# EAGLE board PCB_ESP32_v19 (EAGLE 9.7.0)
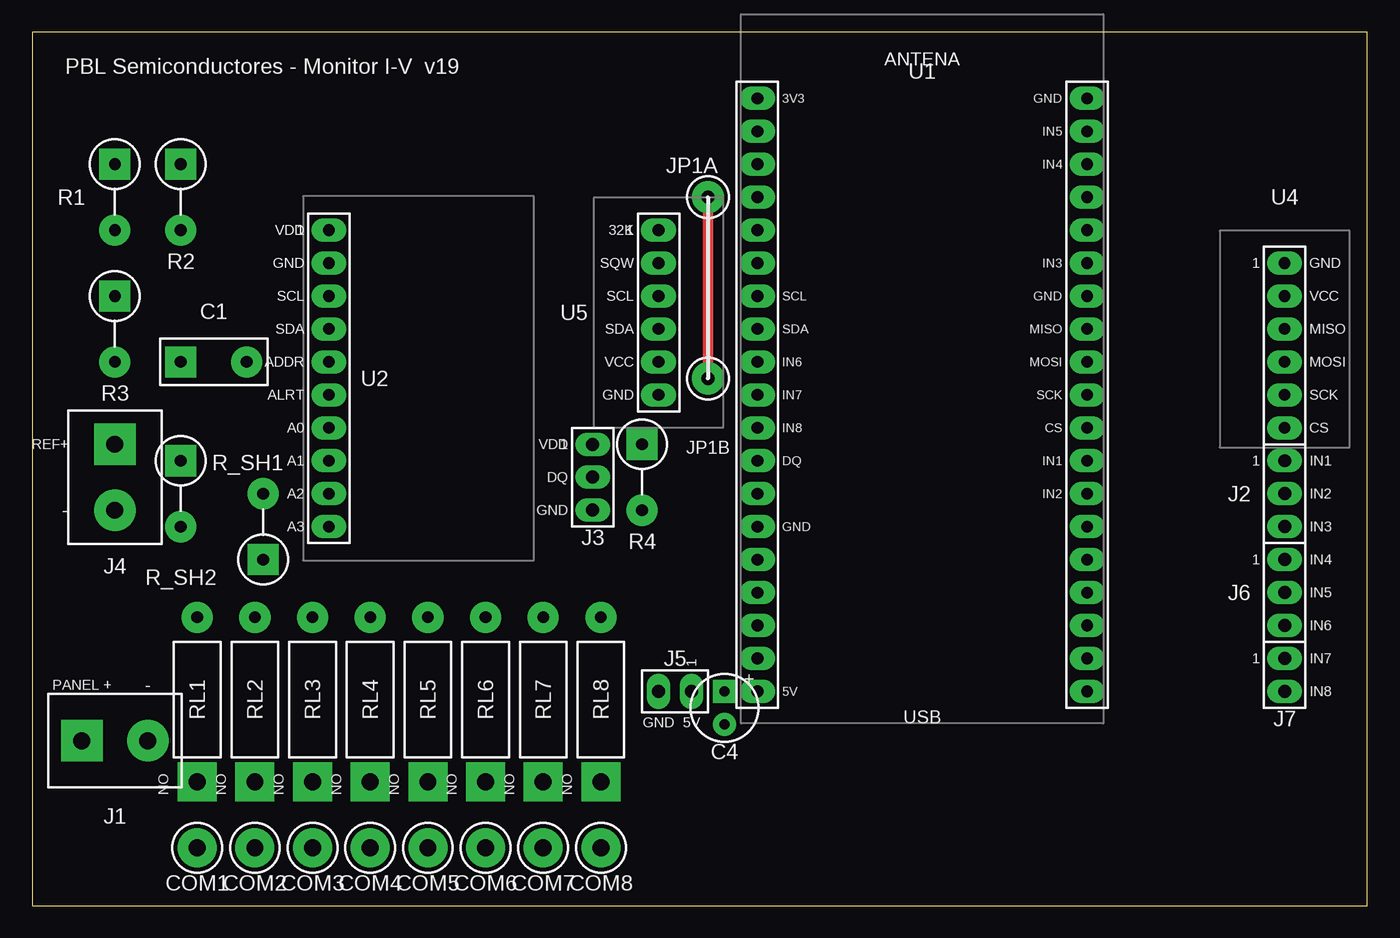
[diagram p0: board, top side]
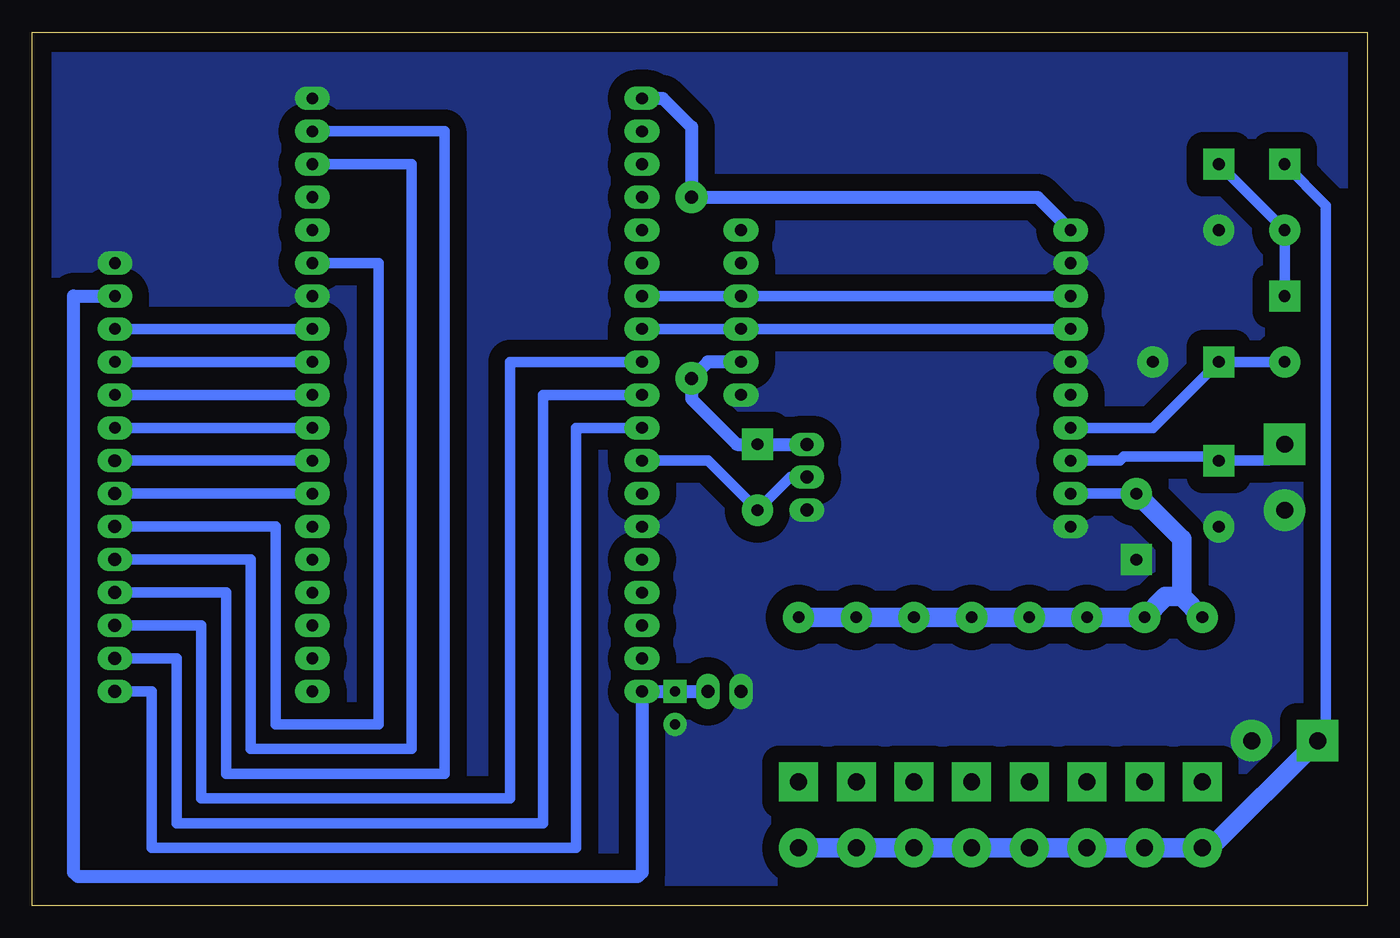
[diagram p1: board, bottom side, seen from below]

Size 102.87 x 67.31 mm. Coordinates in mm from the lower left corner, seen from the top.
Outline: 0,0 102.87,0 102.87,67.31 0,67.31 0,0
Copper layers (1*16): Top 0.035mm / dielectric 1.5mm / Bottom 0.035mm
Design rules "PBL v19 (planchado / percloruro)": minimum track width 0.8mm, minimum drill 0.5mm, track to track 1mm, track to pad 1mm, pad to pad 0.5mm, via to via 0.5mm, smd to smd 6mil, copper to edge 1.5mm, drill to drill 0.3mm, minimum pad ring 0.4mm, minimum via ring 0.4mm, stop-mask expansion 4mil, vias tented up to drill 9999mil, thermal gap 0.6mm
Net classes: 0 senal: width 0.8 mm, drill 0.8 mm; 1 potencia: width 0.8 mm, drill 0.8 mm; 2 alim: width 0.8 mm, drill 0.8 mm

## Footprints (pad centres in the part's own frame; a part is rotated, then mirrored left to right if it is on the bottom)
CAP_5MM = drill 0.9 pad 2.4 square: 1 0,0 | drill 0.9 pad 2.4 round: 2 5.08,0
CAP_E_2_54 = drill 0.8 pad 1.8 square: 1 0,0 | drill 0.8 pad 1.8 round: 2 2.54,0
WIREPAD = drill 1.3 pad 3 round: 1 0,0
TERM2_5MM = drill 1.3 pad 3.2 square: 1 0,0 | drill 1.3 pad 3.2 round: 2 5.08,0
MALE_1X03 = drill 1 pad 1.8 long: 1 0,0; 2 0,-2.54; 3 0,-5.08
MALE_1X02 = drill 1 pad 1.8 long: 1 0,0; 2 0,-2.54
JPAD = drill 1 pad 2.5 round: 1 0,0
RES_V = drill 0.9 pad 2.4 square: 1 0,0 | drill 0.9 pad 2.4 round: 2 5.08,0
RES_H_T = drill 1.3 pad 3 square: 1 0,0 | drill 0.9 pad 2.4 round: 2 12.7,0
ESP32_DEVKIT38 = drill 0.9 pad 1.8 long: 1 0,0; 2 0,-2.54; 3 0,-5.08; 4 0,-7.62; 5 0,-10.16; 6 0,-12.7; 7 0,-15.24; 8 0,-17.78; 9 0,-20.32; 10 0,-22.86; 11 0,-25.4; 12 0,-27.94; 13 0,-30.48; 14 0,-33.02; 15 0,-35.56; 16 0,-38.1; 17 0,-40.64; 18 0,-43.18; 19 0,-45.72; 20 25.4,-45.72; 21 25.4,-43.18; 22 25.4,-40.64; 23 25.4,-38.1; 24 25.4,-35.56; 25 25.4,-33.02; 26 25.4,-30.48; 27 25.4,-27.94; 28 25.4,-25.4; 29 25.4,-22.86; 30 25.4,-20.32; 31 25.4,-17.78; 32 25.4,-15.24; 33 25.4,-12.7; 34 25.4,-10.16; 35 25.4,-7.62; 36 25.4,-5.08; 37 25.4,-2.54; 38 25.4,0
SOCKET_1X10 = drill 0.9 pad 1.8 long: 1 0,0; 2 0,-2.54; 3 0,-5.08; 4 0,-7.62; 5 0,-10.16; 6 0,-12.7; 7 0,-15.24; 8 0,-17.78; 9 0,-20.32; 10 0,-22.86
SOCKET_1X06 = drill 0.9 pad 1.8 long: 1 0,0; 2 0,-2.54; 3 0,-5.08; 4 0,-7.62; 5 0,-10.16; 6 0,-12.7

## Placement (x,y rotation side)
C1  0.1u  [CAP_5MM]  11.43,41.91 0 top
C4  10u 16V  [CAP_E_2_54]  53.34,16.51 270 top
COM1  COM K1  [WIREPAD]  12.7,4.45 0 top
COM2  COM K2  [WIREPAD]  17.14,4.45 0 top
COM3  COM K3  [WIREPAD]  21.59,4.45 0 top
COM4  COM K4  [WIREPAD]  26.04,4.45 0 top
COM5  COM K5  [WIREPAD]  30.48,4.45 0 top
COM6  COM K6  [WIREPAD]  34.92,4.45 0 top
COM7  COM K7  [WIREPAD]  39.37,4.45 0 top
COM8  COM K8  [WIREPAD]  43.81,4.45 0 top
J1  Panel  [TERM2_5MM]  3.81,12.7 0 top
J2  Reles IN1-IN3  [MALE_1X03]  96.52,34.29 0 top
J3  DS18B20  [MALE_1X03]  43.18,35.56 0 top
J4  Celda referencia  [TERM2_5MM]  6.35,35.56 270 top
J5  Rele 5V y GND  [MALE_1X02]  50.8,16.51 270 top
J6  Reles IN4-IN6  [MALE_1X03]  96.52,26.67 0 top
J7  Reles IN7-IN8  [MALE_1X02]  96.52,19.05 0 top
JP1A  Puente 1 (3V3)  [JPAD]  52.07,54.61 0 top
JP1B  Puente 1 (3V3)  [JPAD]  52.07,40.64 0 top
R1  33k 1%  [RES_V]  6.35,57.15 270 top
R2  10k 1%  [RES_V]  11.43,57.15 270 top
R3  1k  [RES_V]  6.35,46.99 270 top
R4  4.7k  [RES_V]  46.99,35.56 270 top
R_SH1  1  [RES_V]  17.78,26.67 90 top
R_SH2  1  [RES_V]  11.43,34.29 270 top
RL1  2.2  [RES_H_T]  12.7,9.53 90 top
RL2  4.7  [RES_H_T]  17.14,9.53 90 top
RL3  10  [RES_H_T]  21.59,9.53 90 top
RL4  22  [RES_H_T]  26.04,9.53 90 top
RL5  47  [RES_H_T]  30.48,9.53 90 top
RL6  100  [RES_H_T]  34.92,9.53 90 top
RL7  220  [RES_H_T]  39.37,9.53 90 top
RL8  470  [RES_H_T]  43.81,9.53 90 top
U1  ESP32 DevKitC 38 pines  [ESP32_DEVKIT38]  55.88,62.23 0 top
U2  ADS1115 (modulo)  [SOCKET_1X10]  22.86,52.07 0 top
U4  Modulo microSD SPI  [SOCKET_1X06]  96.52,49.53 0 top
U5  Modulo RTC DS3231  [SOCKET_1X06]  48.26,52.07 0 top

## Library data of the parts
C1 C4 COM1-COM8 J1-J7 JP1A JP1B R1-R4 R_SH1 R_SH2 RL1-RL8 U1 U2 U4 U5 = PCB_PBL_Semiconductores

## Nets
3V3 [alim]: J3.1 JP1A.1 JP1B.1 R4.1 U1.1 U2.1 U5.5
5V [alim]: C4.1 J5.1 U1.19 U4.2
A0: C1.1 R3.2 U2.7
CS: U1.28 U4.6
DIV: R1.2 R2.1 R3.1
DQ: J3.2 R4.2 U1.12
GND [alim]: C1.2 C4.2 J1.2 J3.3 J4.2 J5.2 R2.2 R_SH1.1 R_SH2.2 U1.14 U1.32 U1.38 U2.2 U2.5 U2.10 U4.1 U5.6
IN1: J2.1 U1.27
IN2: J2.2 U1.26
IN3: J2.3 U1.33
IN4: J6.1 U1.36
IN5: J6.2 U1.37
IN6: J6.3 U1.9
IN7: J7.1 U1.10
IN8: J7.2 U1.11
LB [potencia]: R_SH1.2 RL1.2 RL2.2 RL3.2 RL4.2 RL5.2 RL6.2 RL7.2 RL8.2 U2.9
MISO: U1.31 U4.3
MOSI: U1.30 U4.4
NO1: RL1.1
NO2: RL2.1
NO3: RL3.1
NO4: RL4.1
NO5: RL5.1
NO6: RL6.1
NO7: RL7.1
NO8: RL8.1
PV [potencia]: COM1.1 COM2.1 COM3.1 COM4.1 COM5.1 COM6.1 COM7.1 COM8.1 J1.1 R1.1
REF: J4.1 R_SH2.1 U2.8
SCK: U1.29 U4.5
SCL: U1.7 U2.3 U5.3
SDA: U1.8 U2.4 U5.4

## Tracks (layer width: path | path; a pad name or v marks a point on that pad's centre or on a via)
3V3
  Top 0.8: JP1A.1 JP1B.1
  Bottom 1: U1.1 54.29,62.23 52.07,60.01 JP1A.1 25.4,54.61 U2.1 | U5.5 50.8,41.91 JP1B.1 52.07,39.05 48.58,35.56 R4.1 J3.1
5V
  Bottom 1: J5.1 C4.1 U1.19 55.88,2.54 56.2,2.22 99.38,2.22 99.69,2.54 99.69,46.99 U4.2
A0
  Bottom 0.8: U2.7 16.51,36.83 C1.1 R3.2
CS
  Bottom 0.8: U1.28 U4.6
DIV
  Bottom 0.8: R3.1 R1.2 R2.1
DQ
  Bottom 0.8: U1.12 50.8,34.29 R4.2 44.45,33.02 J3.2
GND
  pour Bottom (isolate 1.3, no thermals): 0.5,0.5 102.37,0.5 102.37,66.81 0.5,66.81
IN1
  Bottom 0.8: U1.27 J2.1
IN2
  Bottom 0.8: U1.26 J2.2
IN3
  Bottom 0.8: U1.33 76.2,49.53 76.2,13.97 84.14,13.97 84.14,29.21 J2.3
IN4
  Bottom 0.8: U1.36 73.66,57.15 73.66,12.06 86.04,12.06 86.04,26.67 J6.1
IN5
  Bottom 0.8: U1.37 71.12,59.69 71.12,10.16 87.95,10.16 87.95,24.13 J6.2
IN6
  Bottom 0.8: U1.9 66.04,41.91 66.04,8.26 89.85,8.26 89.85,21.59 J6.3
IN7
  Bottom 0.8: U1.10 63.5,39.37 63.5,6.35 91.76,6.35 91.76,19.05 J7.1
IN8
  Bottom 0.8: U1.11 60.96,36.83 60.96,4.45 93.66,4.45 93.66,16.51 J7.2
LB
  Bottom 0.8: U2.9 R_SH1.2
  Bottom 1.5: R_SH1.2 14.29,28.26 14.29,23.81 | 14.29,23.81 RL1.2 | 14.29,23.81 15.56,23.81 RL2.2 RL3.2 RL4.2 RL5.2 RL6.2 RL7.2 RL8.2
MISO
  Bottom 0.8: U1.31 U4.3
MOSI
  Bottom 0.8: U1.30 U4.4
PV
  Bottom 0.8: J1.1 3.17,13.34 3.17,53.98 R1.1
  Bottom 1.5: J1.1 12.06,4.45 COM1.1 COM2.1 COM3.1 COM4.1 COM5.1 COM6.1 COM7.1 COM8.1
REF
  Bottom 0.8: U2.8 19.05,34.29 18.73,34.61 11.75,34.61 R_SH2.1 7.62,34.29 J4.1
SCK
  Bottom 0.8: U1.29 U4.5
SCL
  Bottom 0.8: U1.7 U5.3 U2.3
SDA
  Bottom 0.8: U1.8 U5.4 U2.4

## Text on the board
tPlace: PBL Semiconductores - Monitor I-V v19 | 3V3 | GND | IN5 | IN4 | VDD | 32K | GND | SQW | IN3 | GND | SCL | SCL | SCL | GND | VCC | SDA | SDA | SDA | MISO | MISO | ADDR | VCC | IN6 | MOSI | MOSI | ALRT | GND | IN7 | SCK | SCK | A0 | IN8 | CS | CS | REF+ | VDD | A1 | DQ | IN1 | IN1 | DQ | A2 | IN2 | IN2 | - | GND | A3 | GND | IN3 | IN4 | IN5 | IN6 | IN7 | PANEL + | - | 5V | IN8 | GND | 5V
tDocu: ADS1115 (modulo plano, 28x17.8) | RTC parado (pines en L) | microSD parada